# Altium PCB Power_Board.PcbDoc (part 1 of 2)
Units mm, origin at the board's own origin, x right, y up, seen from the top; angles counter-clockwise.
Board outline 220 x 160 mm, 2 copper layers (Top Layer, Bottom Layer), stack 1.58 mm thick; 209 components, 107 nets, 531 pads, 153 vias.
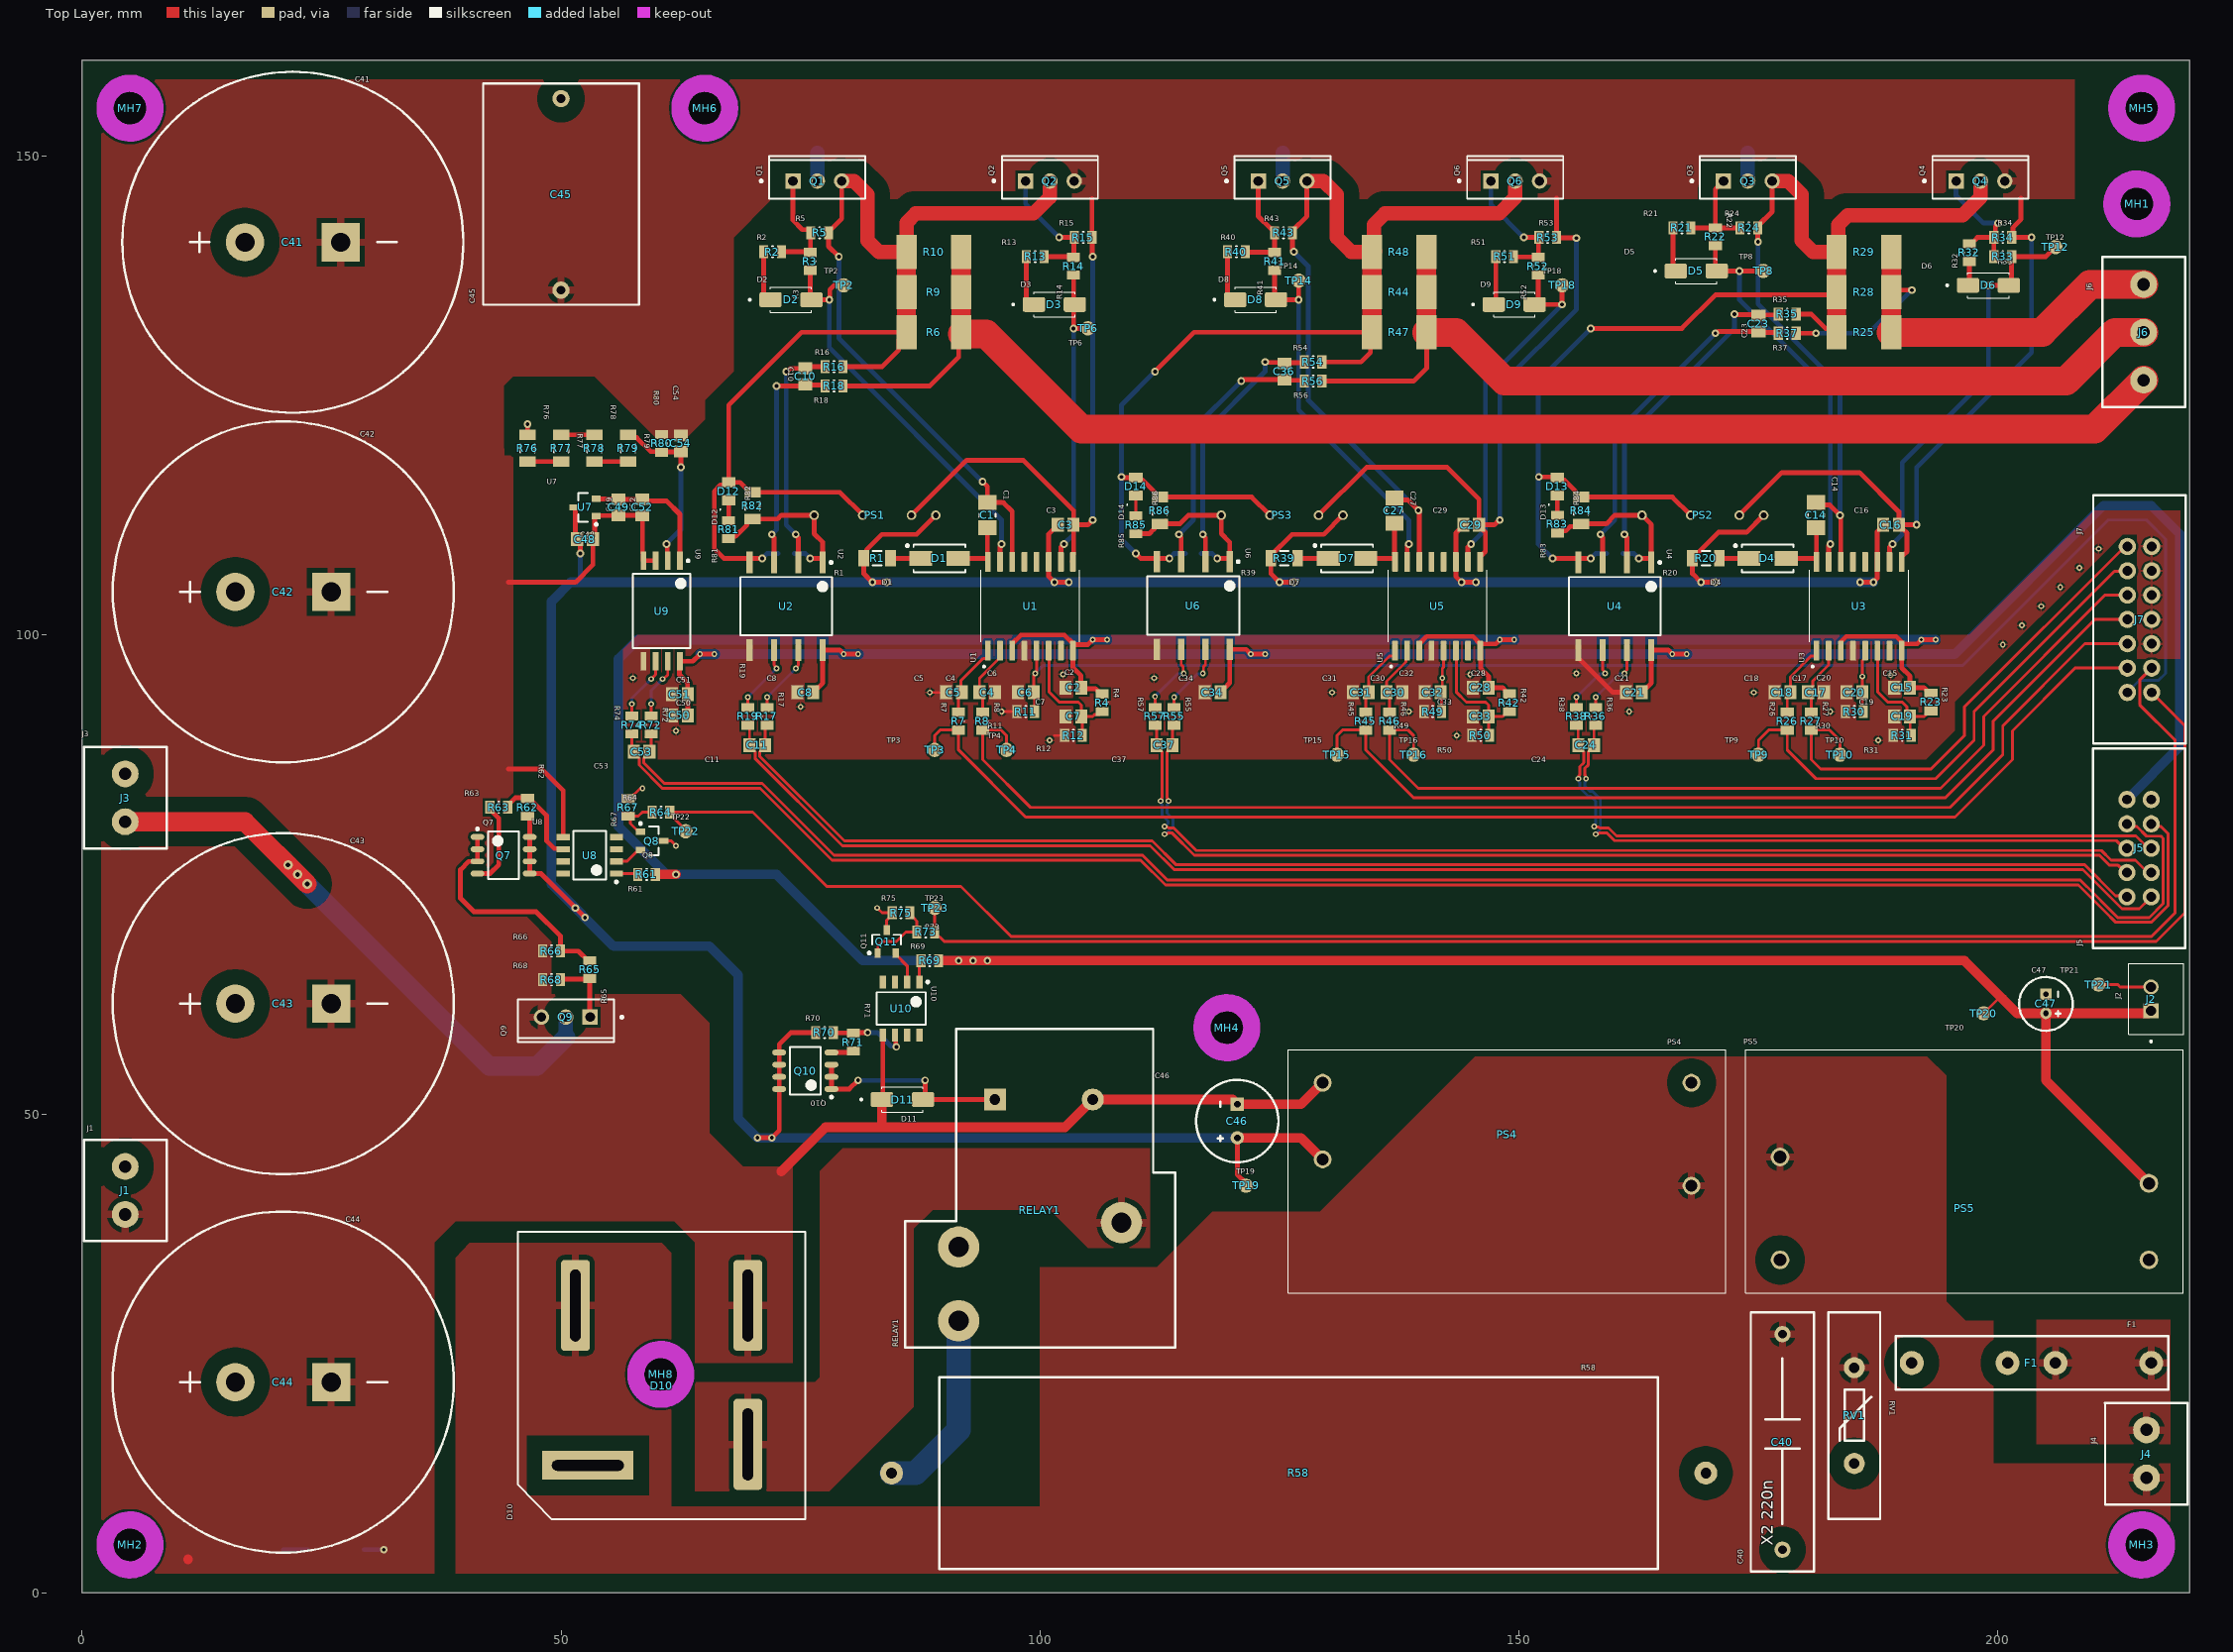
[diagram p0: Top Layer view]
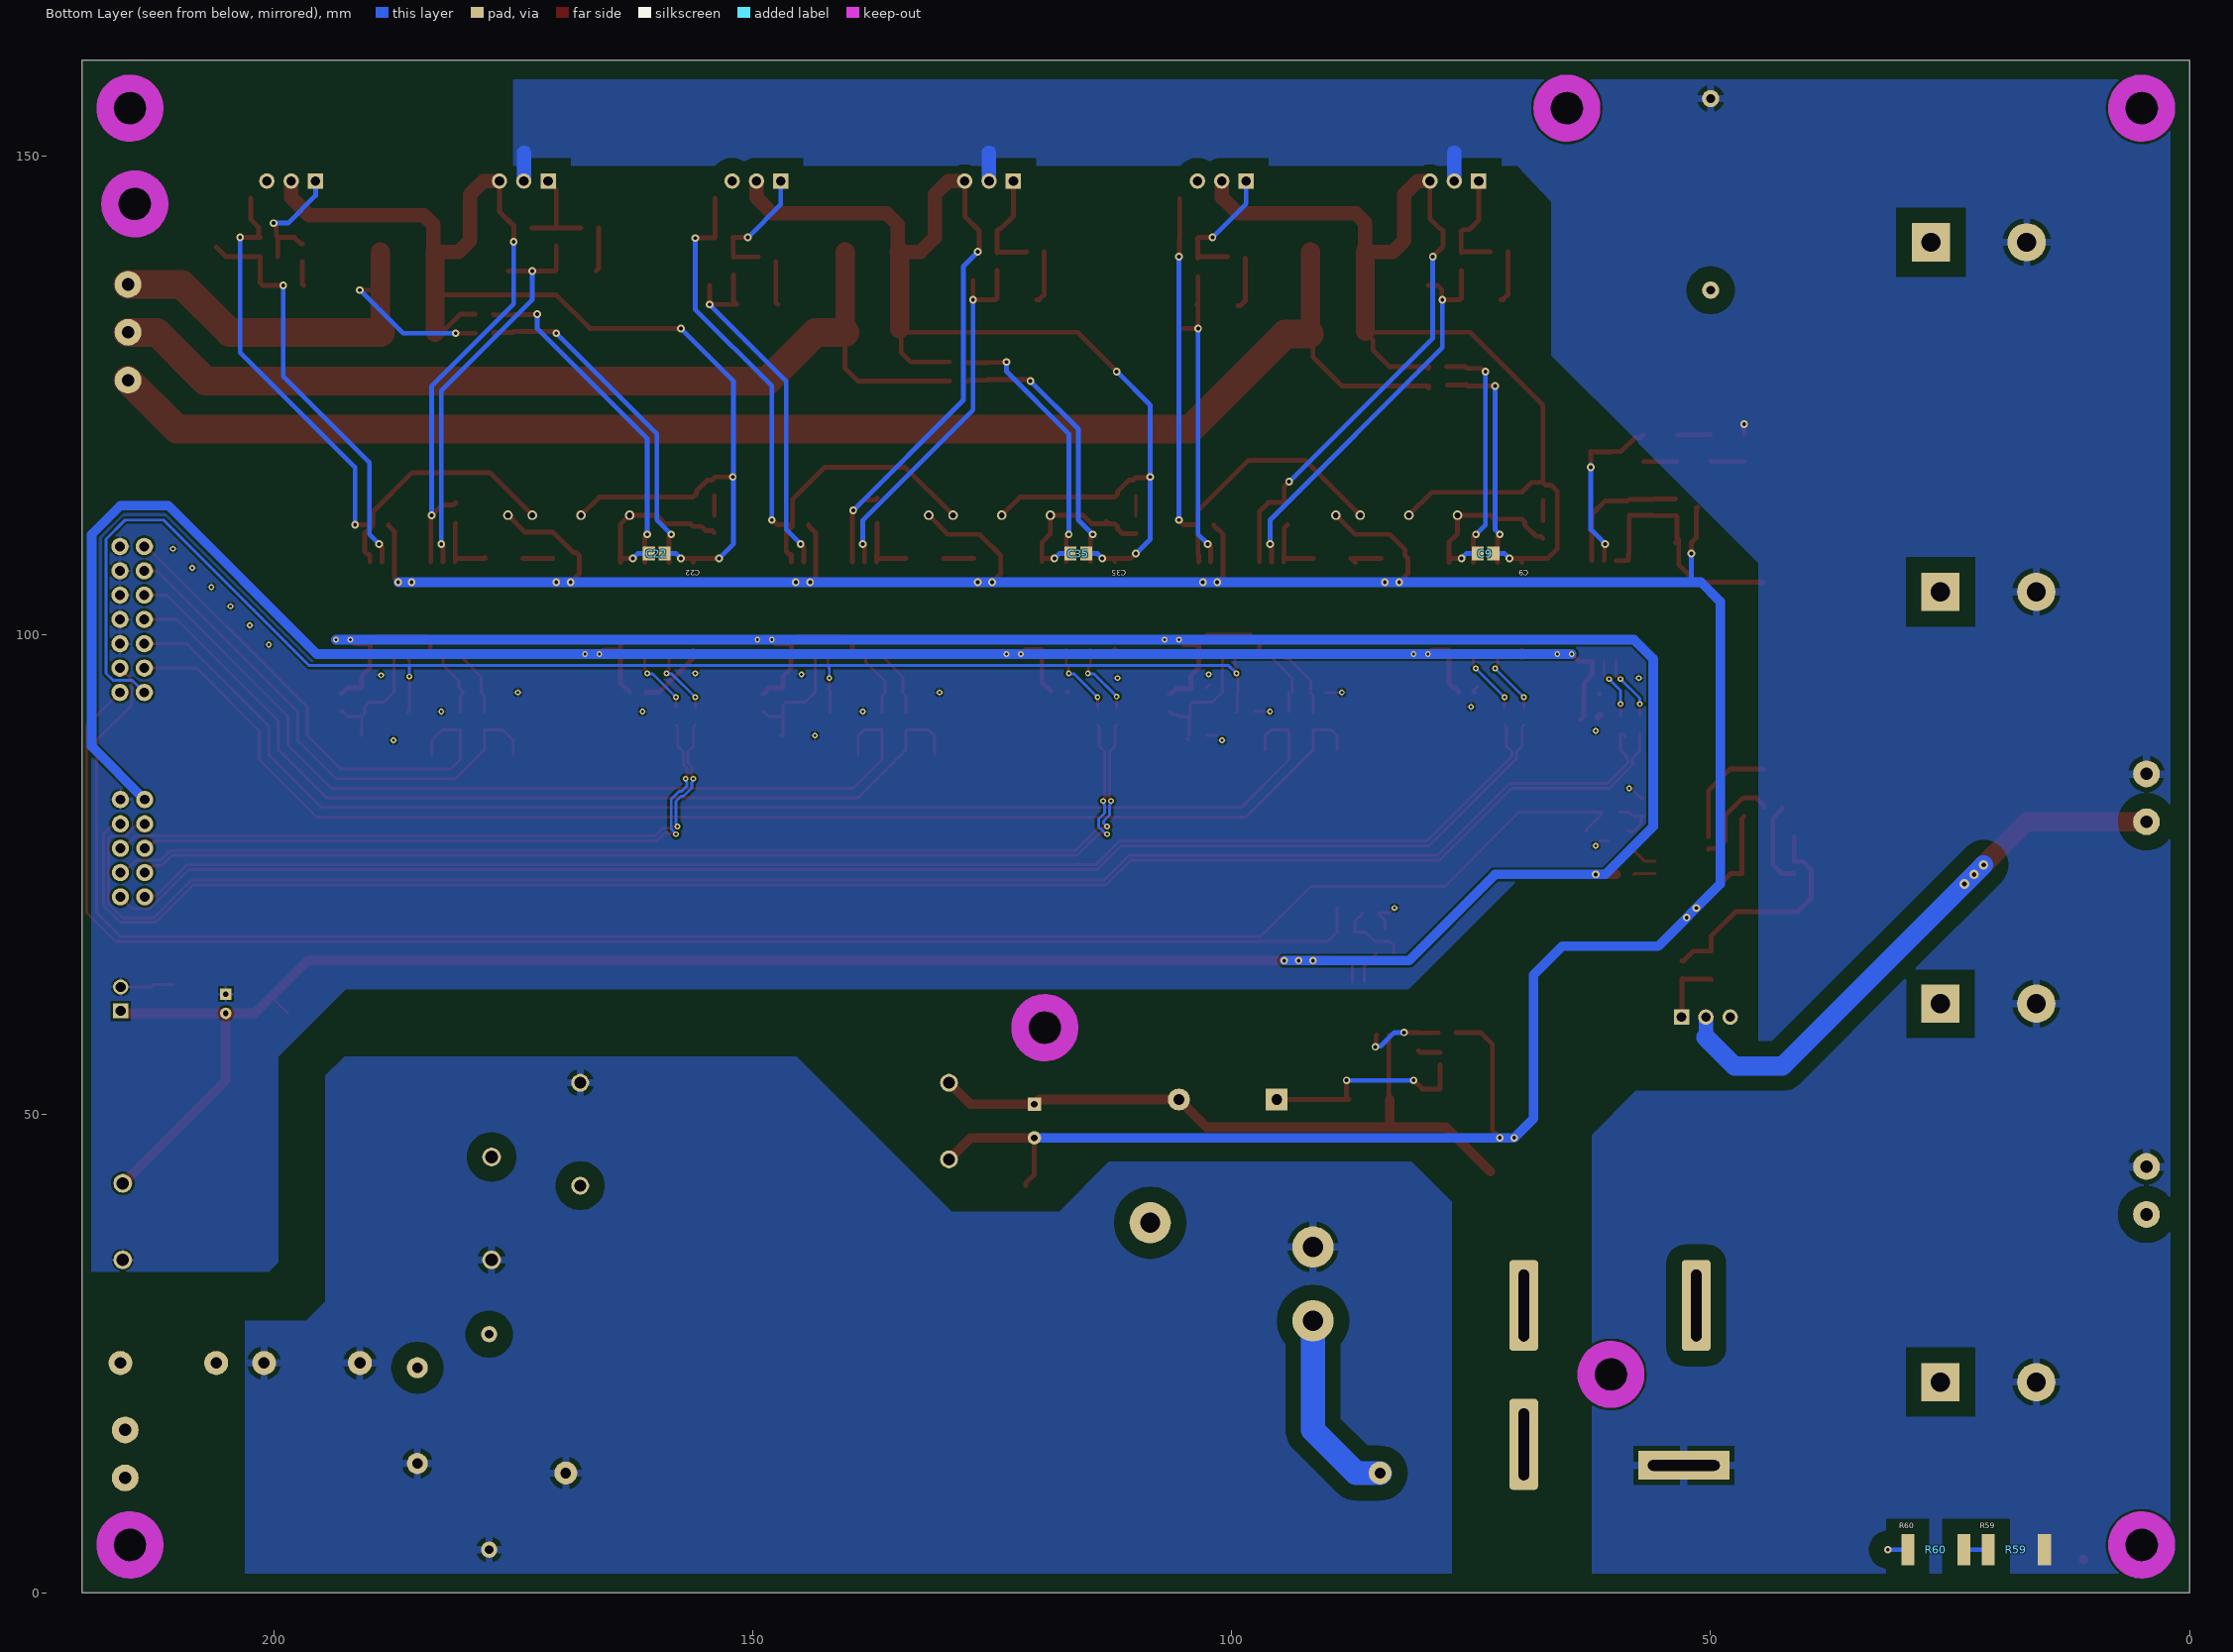
[diagram p1: Bottom Layer view, seen from below]
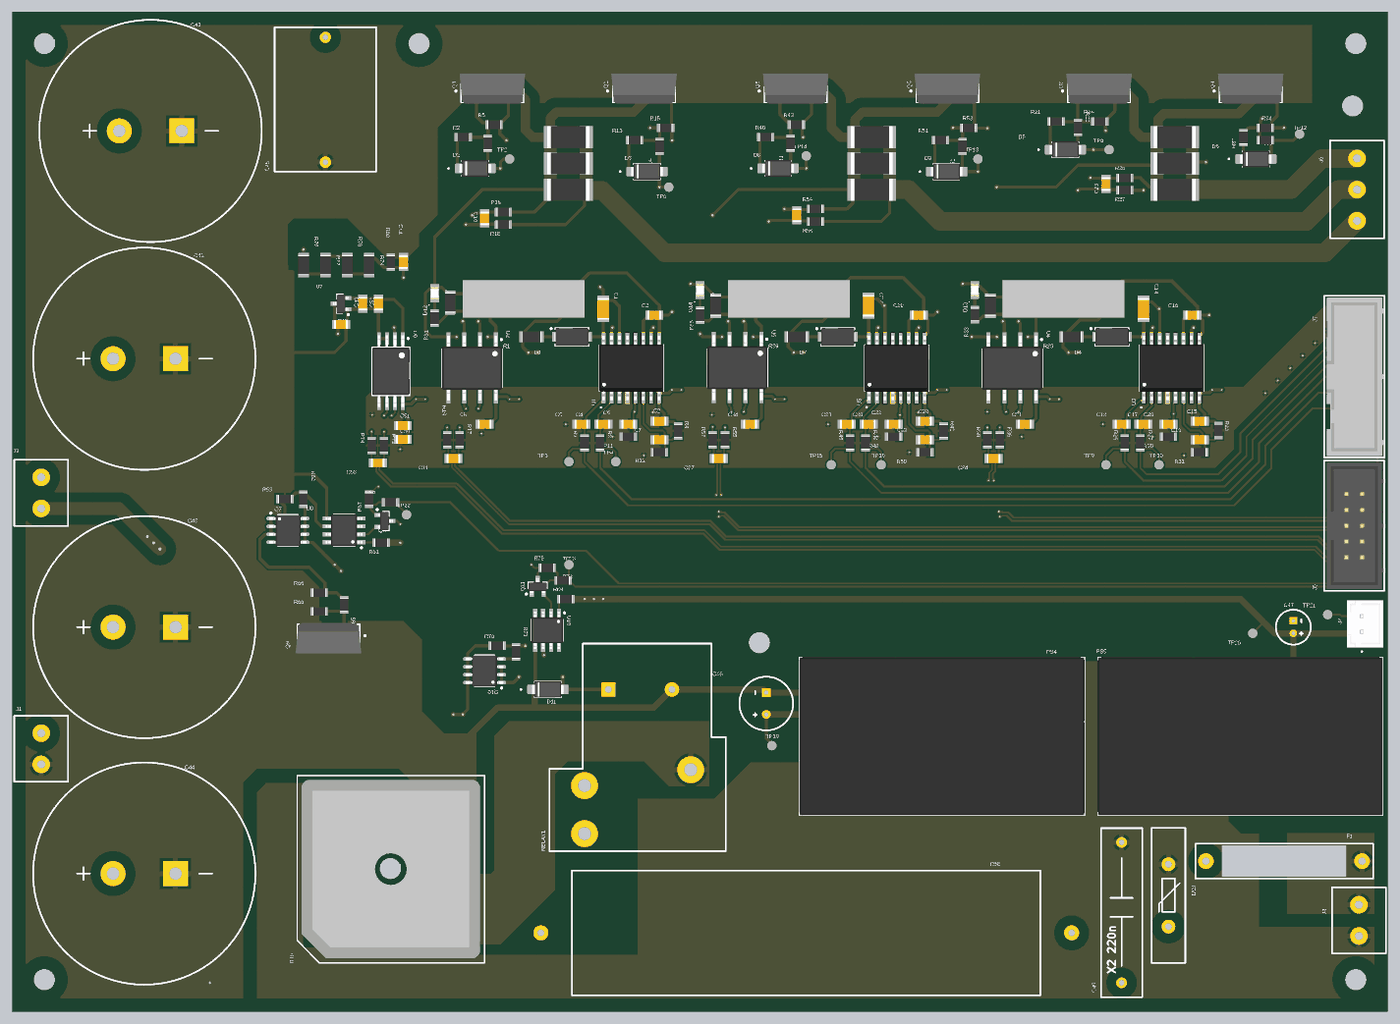
[diagram p3: 3D render of the assembled board from above, using the file's embedded part models]
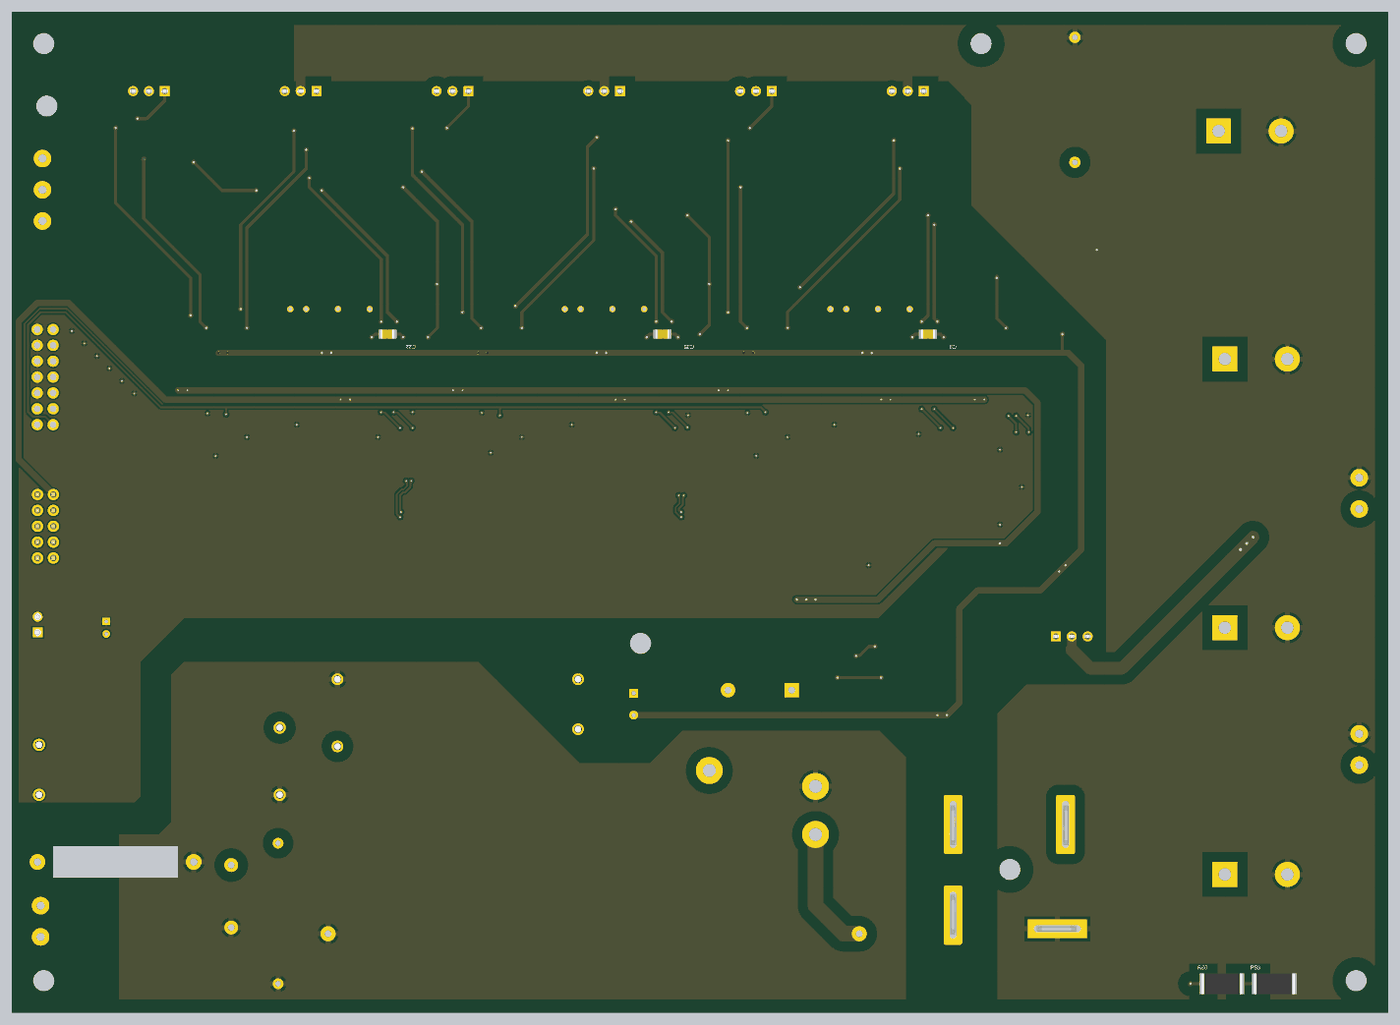
[diagram p4: 3D render of the assembled board from below, using the file's embedded part models]

## Layer stack, top to bottom
Top Solder: solder mask 0.0102, Solder Resist, Dk 3.5
Top Layer: signal copper 0.07
Dielectric 1: dielectric 1.4397, FR-4, Dk 4.8
Bottom Layer: signal copper 0.07
Bottom Solder: solder mask 0.0102, Solder Resist, Dk 3.5

## Board outline
0,0 0,160 220,160 220,0

## Design rules (kind name [scope] priority, off if disabled: settings)
Clearance +VDC_midpoints [InPadClass('transistor_midpoints') vs InNet('+VDC')] p1: gap=0.95 ignorepadtopadclearanceinfootprint=TRUE
Clearance transistors [InPadClass('hot_transistors') vs IsTrack] p2: gap=0.95 ignorepadtopadclearanceinfootprint=TRUE
Clearance signals_hot [InNetClass('Signals_hot_low') OR InNetClass('-VDC') vs InNetClass('Signals_hot_high') OR InNetClass('Midpoints')] p3: gap=1.6 ignorepadtopadclearanceinfootprint=TRUE
Clearance signals_cold_2 [InNetClass('Signals_Cold') vs InNetClass('-VDC') OR InNetClass('High_Power') OR InNetClass('Midpoints') OR InNetClass('Signals_hot_high') OR InNetClass('Signals_hot_low')] p4: gap=4 ignorepadtopadclearanceinfootprint=TRUE
Clearance signals_cold_1 [InNetClass('Signals_Cold') vs InNetClass('Signals_Cold')] p5: gap=0.2 ignorepadtopadclearanceinfootprint=TRUE
Clearance signals_hot_high_1 [InNetClass('Signals_hot_high') vs InNetClass('Signals_hot_high') OR  InNetClass('Midpoints')] p6: gap=0.3 ignorepadtopadclearanceinfootprint=TRUE
Clearance signals_hot_low_1 [InNetClass('Signals_hot_low') vs InNetClass('-VDC') OR InNetClass('Signals_hot_low')] p7: gap=0.3 ignorepadtopadclearanceinfootprint=TRUE
Clearance high_power_1 [InNetClass('High_Power') vs InNetClass('-VDC') OR InNetClass('High_Power') OR InNetClass('Midpoints') OR InNetClass('Signals_hot_high') OR InNetClass('Signals_hot_low')] p8: gap=1.6 ignorepadtopadclearanceinfootprint=TRUE
Creepage [All] p1: checkdistance=0.254 applytopolygonpour=TRUE
DiffPairsRouting [All] p1: maxlimit=0.5 minlimit=0.2 mostfreqgap=0.2 toplayer_minwidth=0.3 toplayer_maxwidth=0.5 toplayer_prefwidth=0.3 bottomlayer_minwidth=0.3 bottomlayer_maxwidth=0.5 bottomlayer_prefwidth=0.3 maxuncoupledlength=12.7
Height [All] p1: minheight=0 maxheight=26 prefheight=12.7
HoleSize [All] p1: absolutevalues=TRUE maxlimit=8 minlimit=0.025 maxpercent=80.000 minpercent=20.000
PlaneClearance [All] p1: clearance=0.5
PlaneConnect [All] p1: planeconnectstyle=Relief reliefexpansion=0.5 reliefentries=4 reliefconductorwidth=0.3 reliefairgap=0.3
PolygonConnect high_power_polygon [InNetClass('High_Power') OR InNetClass('Midpoints') OR InNetClass('-VDC')] p1: thpad.connectstyle=Relief thpad.reliefconductorwidth=0.8 thpad.reliefentries=4 thpad.polygonreliefangle="90 Angle" thpad.airgapwidth=0.5 smdpad.connectstyle=Direct smdpad.reliefconductorwidth=0.8 smdpad.reliefentries=4 smdpad.polygonreliefangle="90 Angle" smdpad.airgapwidth=0.5 via.connectstyle=Direct via.reliefconductorwidth=0.8 via.reliefentries=4 via.polygonreliefangle="90 Angle" via.airgapwidth=0.5
PolygonConnect signals_hot_polygon [InNetClass('Signals_hot_high') OR InNetClass('Signals_hot_low')] p2: connectstyle=Relief reliefconductorwidth=0.3 reliefentries=4 polygonreliefangle="90 Angle" airgapwidth=0.3
PolygonConnect signals_cold_polygon [InNetClass('Signals_Cold')] p3: thpad.connectstyle=Relief thpad.reliefconductorwidth=0.3 thpad.reliefentries=4 thpad.polygonreliefangle="90 Angle" thpad.airgapwidth=0.2 smdpad.connectstyle=Direct smdpad.reliefconductorwidth=0.2 smdpad.reliefentries=4 smdpad.polygonreliefangle="90 Angle" smdpad.airgapwidth=0.2 via.connectstyle=Relief via.reliefconductorwidth=0.2 via.reliefentries=4 via.polygonreliefangle="90 Angle" via.airgapwidth=0.2
RoutingCorners [All] p1: cornerstyle=45-Degree minsetback=3 maxsetback=3
RoutingVias high_power_via [InNetClass('High_Power') OR InNetClass('Midpoints') OR InNetClass('-VDC')] p1: holewidth=0.5 width=1 viastyle="Through Hole" minholewidth=0.4 minwidth=0.8 maxholewidth=0.6 maxwidth=1.2
RoutingVias signals_hot_via [InNetClass('Signals_hot_high') OR InNetClass('Signals_hot_low')] p2: holewidth=0.4 width=0.8 viastyle="Through Hole" minholewidth=0.3 minwidth=0.6 maxholewidth=0.5 maxwidth=1
RoutingVias signals_cold_via [InNetClass('Signals_Cold')] p3: holewidth=0.3 width=0.6 viastyle="Through Hole" minholewidth=0.2 minwidth=0.4 maxholewidth=0.4 maxwidth=0.8
SolderMaskExpansion SolderMask_Via [IsVia] p1: expansion=0.102 istentingtop=TRUE
SolderMaskExpansion SolderMask_Pad [IsPad] p2: expansion=0.05 istentingtop=FALSE
UnRoutedNet [All] p1: checkbadconnections=TRUE
Width signals_cold_width [InNetClass('Signals_Cold')] p1: maxlimit=1 minlimit=0.2 preferedwidth=0.3 minimp=50.000000 maximp=50.000000 favimp=50.000000
Width high_power_width [InNetClass('High_Power') OR InNetClass('Midpoints') OR InNetClass('-VDC')] p2: maxlimit=5 minlimit=0.5 preferedwidth=2 minimp=50.000000 maximp=50.000000 favimp=50.000000
Width signals_hot_width [InNetClass('Signals_hot_high') OR InNetClass('Signals_hot_low')] p3: maxlimit=2 minlimit=0.3 preferedwidth=0.5 minimp=50.000000 maximp=50.000000 favimp=50.000000
23 further rules are at their usual default settings.

## Classes and differential pairs
component class Designator: C48 C49 C50 C51 C52 C53 C54 D11 Q7 Q8 Q9 Q10 Q11 R61 R62 R63 R64 R65 R66 R67 R68 R69 R70 R71 R72 R73 R74 R75 R76 R77 R78 R79 R80 TP22 TP23 U7 U8 U9 U10
pad class transistor_midpoints: Q1-3 Q3-3 Q5-3
net class -VDC: -VDC
net class Midpoints: MIDPOINT_2 MIDPOINT_3 MIDPOINT_4 OUT_1_N OUT_AUX_1 OUT_MAIN_1
net class Signals_hot_high: 5V_HOT_2 5V_HOT_3 5V_HOT_4 +12V_BOOT_2 +12V_BOOT_3 +12V_BOOT_4 NetC10_1 NetC10_2 NetC23_1 NetC23_2 NetC36_1 NetC36_2 NetD2_1 NetD5_1 NetD8_1 NetD12_1 NetD13_1 NetD14_1 NetQ1_1 NetQ3_1 NetQ5_1 OUTA_2 OUTA_3 OUTA_4
net class Signals_hot_low: +5V_HOT_6 +12V +COIL_1 NetD1_1 NetD3_1 NetD4_1 NetD6_1 NetD7_1 NetD9_1 NetQ2_1 NetQ4_1 NetQ6_1 NetQ7_1 NetQ7_3 NetQ9_1 NetQ10_1 NetR62_1 NetR70_1 NetR76_1 NetR77_2 NetR78_1 OUTB_2 OUTB_3 OUTB_4 V_MEAS_6
pad class hot_transistors: Q1-1 Q1-2 Q1-3 Q2-1 Q2-2 Q2-3 Q3-1 Q3-2 Q3-3 Q4-1 Q4-2 Q4-3 Q5-1 Q5-2 Q5-3 Q6-1 Q6-2 Q6-3 Q9-1 Q9-2 Q9-3
net class Signals_Cold: +3V3A +5V +ISENSE_1_N +ISENSE_AUX_1 +ISENSE_MAIN_1 +VSENSE_1 -ISENSE_1_N -ISENSE_AUX_1 -ISENSE_MAIN_1 -VSENSE_1 BRAKE_1 DISABLE_1 GND INA_1_N INA_AUX_1 INA_MAIN_1 INB_1_N INB_AUX_1 INB_MAIN_1 NetC4_2 NetC5_2 NetC7_2 NetC17_2 NetC18_2 NetC19_2 NetC30_2 NetC31_2 NetC33_2 NetQ8_1 NetQ8_2 NetQ11_1 NetQ11_2 NetR17_1 NetR19_1 NetR36_1 NetR38_1 NetR55_1 NetR57_1 NetR61_1 NetR69_1 OUTN_6 OUTP_6 PRECHARGE_1
net class High_Power: +VDC AC_L_FUSED_5 AC_N NetD10_2 NetF1_1 NetJ3_2 NetR58_2 NetR59_1
differential pair VSENSE: ++VSENSE_1 --VSENSE_1
differential pair ISENSE_MAIN: ++ISENSE_MAIN_1 --ISENSE_MAIN_1
differential pair ISENSE_AUX: ++ISENSE_AUX_1 --ISENSE_AUX_1
differential pair ISENSE_N: ++ISENSE_1_N --ISENSE_1_N

## Components (designator, comment, footprint, x,y, rotation, side; value= is the part's Value field where it differs from the comment)
C1 "10u" CAPACITOR_1206 94.5,112.5 r90 top
C2 "1u" Capacitor_0805 103.5,94.5 r180 top
C3 "1u" Capacitor_0805 102.675,111.5 r180 top
C4 "22p" Capacitor_0805 94.5,94 r180 top
C5 "22p" Capacitor_0805 91,94 r0 top
C6 "1n" Capacitor_0805 98.5,94 r0 top
C7 "100p" Capacitor_0805 103.5,91.5 r0 top
C8 "100n" Capacitor_0805 75.5,94 r0 top
C9 "1u" Capacitor_0805 73.5,108.5 r0 bottom
C10 "330p" Capacitor_0805 75.5,127 r90 top
C11 "150n" Capacitor_0805 70.5,88.5 r0 top
C14 "1u" CAPACITOR_1206 181,112.5 r90 top
C15 "1u" Capacitor_0805 190,94.5 r180 top
C16 "1u" Capacitor_0805 188.825,111.5 r180 top
C17 "22p" Capacitor_0805 181,94 r180 top
C18 "22p" Capacitor_0805 177.5,94 r0 top
C19 "100p" Capacitor_0805 190,91.5 r0 top
C20 "1n" Capacitor_0805 185,94 r0 top
C21 "100n" Capacitor_0805 162,94 r0 top
C22 "1u" Capacitor_0805 160,108.5 r0 bottom
C23 "330p" Capacitor_0805 175,132.5 r90 top
C24 "150n" Capacitor_0805 157,88.5 r0 top
C27 "10u" CAPACITOR_1206 137,113 r90 top
C28 "1u" Capacitor_0805 146,94.5 r180 top
C29 "1u" Capacitor_0805 145,111.5 r180 top
C30 "22p" Capacitor_0805 137,94 r180 top
C31 "22p" Capacitor_0805 133.5,94 r0 top
C32 "1n" Capacitor_0805 141,94 r0 top
C33 "100p" Capacitor_0805 146,91.5 r0 top
C34 "100n" Capacitor_0805 118,94 r0 top
C35 "1u" Capacitor_0805 116,108.5 r0 bottom
C36 "330p" Capacitor_0805 125.5,127.5 r90 top
C37 "150n" Capacitor_0805 113,88.5 r0 top
C40 "X2 220n" R46KN322000M1K 177.5,27 r0 top
C41 "470u" HF2G477M35040HC 27,141 r180 top
C42 "470u" HF2G477M35040HC 26,104.5 r180 top
C43 "470u" HF2G477M35040HC 26,61.5 r180 top
C44 "470u" HF2G477M35040HC 26,22 r180 top
C45 "1u" MPP-1UR20/630 50,136 r90 top
C46 "220u" EEUFR1V221 120.6,51 r270 top
C47 "47u" RD1C476M05011BB 205,62.5 r270 top
C48 "1u" Capacitor_0805 52.5,110 r180 top
C49 "10u" Capacitor_0805 56,113.325 r90 top
C50 "1u" Capacitor_0805 62.4,91.6 r0 top
C51 "100n" Capacitor_0805 62.4,93.8 r0 top
C52 "100n" Capacitor_0805 58.5,113.325 r90 top
C53 "150n" Capacitor_0805 58.4,87.8 r0 top
C54 "100p" Capacitor_0805 62.5,120 r270 top
D1 "STTH1R06A" STTH1R06A 89.5,108 r0 top
D2 "SS14" DIOM5226X230N 74,135 r0 top
D3 "SS14" DIOM5226X230N 101.5,134.5 r0 top
D4 "STTH1R06A" STTH1R06A 175.95,108 r0 top
D5 "SS14" DIOM5226X230N 168.5,138 r0 top
D6 "SS14" DIOM5226X230N 199,136.5 r0 top
D7 "STTH1R06A" STTH1R06A 132.05,108 r0 top
D8 "SS14" DIOM5226X230N 122.5,135 r0 top
D9 "SS14" DIOM5226X230N 149.5,134.5 r0 top
D10 "Bridge_1ph" KBPCxxxxFP 51.5,13.3 r90 top
D11 "SS14" DIOM5226X230N 85.635,51.5 r0 top
D12 "LTST-C171KRKT" LTST-C171K 67.5,115 r90 top
D13 "LTST-C171KRKT" LTST-C171K 154,115.5 r90 top
D14 "LTST-C171KRKT" LTST-C171K 110,115.5 r90 top
F1 "Fuse clips" 0751.0056 216,24 r180 top
J1 "MKDSN1.5/2" 1729018 4.5,44.5 r0 top
J2 "JST_B2B-XH-A_(LF)(SN)" JST_B2B-XH-A_(LF)(SN) 216.5,62 r270 top
J3 "MKDSN1.5/2" 1729018 4.5,85.5 r0 top
J4 "MKDSN1.5/2" 1729018 215.5,17 r0 top
J5 "DS1013-10SSIB1-B-0" DS1013-10SSIB1-B-0 213.46,72.66 r90 top
J6 "MKDSN 1,5/ 3-5,08" 1729131 215.2,126.6 r180 top
J7 "DS1013-14SSIBG" DS1013-14SSIBG 216.04,109.24 r270 top
MH1 "Mounting Hole" "M3 MOUNTING HOLE" 214.5,145 r0 top
MH2 "Mounting Hole" "M3 MOUNTING HOLE" 5,5 r0 top
MH3 "Mounting Hole" "M3 MOUNTING HOLE" 215,5 r0 top
MH4 "Mounting Hole" "M3 MOUNTING HOLE" 119.5,59 r0 top
MH5 "Mounting Hole" "M3 MOUNTING HOLE" 215,155 r0 top
MH6 "Mounting Hole" "M3 MOUNTING HOLE" 65,155 r0 top
MH7 "Mounting Hole" "M3 MOUNTING HOLE" 5,155 r0 top
MH8 "Mounting Hole" "M3 mounting hole" 60.4,22.8 r0 top
PS1 "TBA 1-1211E" "TBA 1-1211E" 76.42,112.5 r0 top
PS2 "TBA 1-1211E" "TBA 1-1211E" 162.84,112.5 r0 top
PS3 "TBA 1-1211E" "TBA 1-1211E" 118.92,112.5 r0 top
PS4 "IRM-10-12" CONV_IRM-10-12 148.75,44 r180 top
PS5 "IRM-10-5" CONV_IRM-10-5 196.5,44 r0 top
Q1 "WMK36N65C4" TO220-3 76.75,147.4 r90 top
Q2 "WMK36N65C4" TO220-3 101.03,147.4 r90 top
Q3 "WMK36N65C4" TO220-3 173.89,147.4 r90 top
Q4 "WMK36N65C4" TO220-3 198.17,147.4 r90 top
Q5 "WMK36N65C4" TO220-3 125.32,147.4 r90 top
Q6 "WMK36N65C4" TO220-3 149.6,147.4 r90 top
Q7 "AO4485" AO4485 44,77 r0 top
Q8 "BSS806NH6327XTSA1" BSS806NH6327XTSA1 59.5,78.5 r0 top
Q9 "WMK36N65C4" TO220-3 50.5,60.1 r270 top
Q10 "AO4485" AO4485 75.5,54.5 r180 top
Q11 "BSS806NH6327XTSA1" BSS806NH6327XTSA1 84,68 r90 top
R1 "4R7" RESISTOR_1206 83,108 r0 top
R2 "10R" RESISTOR_0805 72.075,140 r0 top
R3 "10R" RESISTOR_0805 76,139 r90 top
R4 "0R" RESISTOR_0805 106.5,92.925 r90 top
R5 "100k" RESISTOR_0805 77,142 r180 top
R6 "30mR" MAR251203FR030S 88.905,131.6 r0 top
R7 "100R" RESISTOR_0805 91.5,91 r90 top
R8 "100R" RESISTOR_0805 94,91 r90 top
R9 "30mR" MAR251203FR030S 88.905,135.8 r0 top
R10 "30mR" MAR251203FR030S 88.905,140 r0 top
R11 "100k" RESISTOR_0805 98.5,92 r0 top value=100R
R12 "2k2" RESISTOR_0805 103.5,89.5 r0 top value=100R
R13 "10R" RESISTOR_0805 99.5,139.5 r0 top
R14 "10R" RESISTOR_0805 103.5,138.5 r90 top
R15 "100k" RESISTOR_0805 104.5,141.5 r180 top
R16 "22R" RESISTOR_0805 78.5,128 r180 top
R17 "100R" RESISTOR_0805 71.5,91.5 r270 top
R18 "22R" RESISTOR_0805 78.5,126 r180 top
R19 "100R" RESISTOR_0805 69.5,91.5 r270 top
R20 "4R7" RESISTOR_1206 169.5,108 r0 top
R21 "10R" RESISTOR_0805 167,142.5 r0 top
R22 "10R" RESISTOR_0805 170.5,141.575 r90 top
R23 "0R" RESISTOR_0805 193,93 r90 top
R24 "100k" RESISTOR_0805 174,142.5 r180 top
R25 "30mR" MAR251203FR030S 186,131.6 r0 top
R26 "100R" RESISTOR_0805 178,91 r90 top
R27 "100R" RESISTOR_0805 180.5,91 r90 top
R28 "30mR" MAR251203FR030S 186,135.8 r0 top
R29 "30mR" MAR251203FR030S 186,140 r0 top
R30 "100k" RESISTOR_0805 185,92 r0 top value=100R
R31 "2k2" RESISTOR_0805 190,89.5 r0 top value=100R
R32 "10R" RESISTOR_0805 197,139.925 r90 top
R33 "10R" RESISTOR_0805 200.5,139.5 r180 top
R34 "100k" RESISTOR_0805 200.5,141.5 r180 top
R35 "22R" RESISTOR_0805 178,133.5 r180 top
R36 "100R" RESISTOR_0805 158,91.5 r270 top
R37 "22R" RESISTOR_0805 178,131.5 r180 top
R38 "100R" RESISTOR_0805 156,91.5 r270 top
R39 "4R7" RESISTOR_1206 125.5,108 r0 top
R40 "10R" RESISTOR_0805 120.5,140 r0 top
R41 "10R" RESISTOR_0805 124.5,139 r90 top
R42 "0R" RESISTOR_0805 149,92.925 r90 top
R43 "100k" RESISTOR_0805 125.425,142 r180 top
R44 "30mR" MAR251203FR030S 137.5,135.8 r0 top
R45 "100R" RESISTOR_0805 134,91 r90 top
R46 "100R" RESISTOR_0805 136.5,91 r90 top
R47 "30mR" MAR251203FR030S 137.5,131.6 r0 top
R48 "30mR" MAR251203FR030S 137.5,140 r0 top
R49 "100k" RESISTOR_0805 141,92 r0 top value=100R
R50 "2k2" RESISTOR_0805 146,89.5 r0 top value=100R
R51 "10R" RESISTOR_0805 148.5,139.5 r0 top
R52 "10R" RESISTOR_0805 152,138.5 r90 top
R53 "100k" RESISTOR_0805 153,141.5 r180 top
R54 "22R" RESISTOR_0805 128.5,128.5 r180 top
R55 "100R" RESISTOR_0805 114,91.5 r270 top
R56 "22R" RESISTOR_0805 128.5,126.5 r180 top
R57 "100R" RESISTOR_0805 112,91.5 r270 top
R58 "220R" CRL30W-220R 169.5,12.5 r180 top
R59 "100k" RESISTOR_2512 18.075,4.5 r180 bottom
R60 "100k" RESISTOR_2512 26.5,4.5 r180 bottom
R61 "390R" RESISTOR_0805 58.925,75 r0 top
R62 "4k7" RESISTOR_0805 46.5,82 r270 top
R63 "2k2" RESISTOR_0805 43.5,82 r0 top
R64 "1k" RESISTOR_0805 60.425,81.5 r180 top
R65 "100R" RESISTOR_0805 53,65.075 r90 top
R66 "2k2" RESISTOR_0805 49,67 r180 top
R67 "47k" RESISTOR_0805 57,82 r270 top
R68 "47k" RESISTOR_0805 49,64 r180 top
R69 "390R" RESISTOR_0805 88.5,66 r0 top
R70 "47k" RESISTOR_0805 77.5,58.5 r180 top
R71 "2k2" RESISTOR_0805 80.5,57.5 r90 top
R72 "100R" RESISTOR_0805 59.4,90.6 r270 top
R73 "1k" RESISTOR_0805 88.075,69 r180 top
R74 "100R" RESISTOR_0805 57.4,90.6 r270 top
R75 "47k" RESISTOR_0805 85.5,71 r0 top
R76 "499k" RESISTOR_1206 46.5,119.5 r90 top
R77 "499k" RESISTOR_1206 50,119.5 r90 top
R78 "499k" RESISTOR_1206 53.5,119.5 r90 top
R79 "499k" RESISTOR_1206 57,119.5 r90 top
R80 "6k2" RESISTOR_0805 60.5,120 r270 top
R81 "1k2" RESISTOR_0805 67.5,111 r90 top
R82 "330R" RESISTOR_1206 70,113.5 r90 top
R83 "1k2" RESISTOR_0805 154,111.575 r90 top
R84 "330R" RESISTOR_1206 156.5,113 r90 top
R85 "1k2" RESISTOR_0805 110,111.5 r90 top
R86 "330R" RESISTOR_1206 112.5,113 r90 top
RELAY1 "R40N3011851012" R40N3011851012 95.3,51.5 r90 top
RV1 "B72220S0271K101" B72220S0271K101 185,23.5 r270 top
TP2 "TestPoint" TestPoint_1.5mm 79.5,136.5 r90 top
TP3 "TestPoint" TestPoint_1.5mm 89,88 r90 top
TP4 "TestPoint" TestPoint_1.5mm 96.5,88 r90 top
TP6 "TestPoint" TestPoint_1.5mm 105,132 r90 top
TP8 "TestPoint" TestPoint_1.5mm 175.5,138 r90 top
TP9 "TestPoint" TestPoint_1.5mm 175,87.5 r90 top
TP10 "TestPoint" TestPoint_1.5mm 183.5,87.5 r90 top
TP12 "TestPoint" TestPoint_1.5mm 206,140.5 r90 top
TP14 "TestPoint" TestPoint_1.5mm 127,137 r90 top
TP15 "TestPoint" TestPoint_1.5mm 131,87.5 r90 top
TP16 "TestPoint" TestPoint_1.5mm 139,87.5 r90 top
TP18 "TestPoint" TestPoint_1.5mm 154.5,136.5 r90 top
TP19 "TestPoint" TestPoint_1.5mm 121.5,42.5 r180 top
TP20 "TestPoint" TestPoint_1.5mm 198.5,60.5 r90 top
TP21 "TestPoint" TestPoint_1.5mm 210.5,63.5 r90 top
TP22 "TestPoint" TestPoint_1.5mm 63,79.5 r90 top
TP23 "TestPoint" TestPoint_1.5mm 89,71.5 r90 top
U1 "UCC21520ADW" UCC21520ADW 99,103 r90 top
U2 "AMC1200STDUBRQ1" SOP254P1040X485-8N 73.5,103 r270 top
U3 "UCC21520ADW" UCC21520ADW 185.5,103 r90 top
U4 "AMC1200STDUBRQ1" SOP254P1040X485-8N 160,103 r270 top
U5 "UCC21520ADW" UCC21520ADW 141.5,103 r90 top
U6 "AMC1200STDUBRQ1" SOP254P1040X485-8N 116,103.075 r270 top
U7 "AP7387-50SA-7" SOT90P240X110-3N 52.5,113.325 r180 top
U8 "MOC207M" SOIC127P590X363-8N 53,77 r180 top
U9 "AMC1211AQDWVQ1" SOIC127P1150X275-8N 60.5,102.5 r270 top
U10 "MOC207M" SOIC127P590X363-8N 85.5,61 r270 top

## Footprints (in the part's own frame and the unit in brackets; to place one, negate y for a bottom-side part, rotate by r counter-clockwise, add the part's x,y. Pads: shape width x height; smd on the part's side, far side on the other; paste and mask are expansions set on the pad)
0751.0056 [mm] "Fuse clips; cylindrical fuses; THT; 5x20mm,6.3x32mm; 16A; bronze"
  round 2.5 hole 1.2: 1(0,0) 2(10,0) 3(15,0) 4(25,0)
  silkscreen extent -1.78,-2.79 26.67,2.79
1729018 [mm] "Connector: PCB terminal block; 17.5A; 400V; PIN: 2; screw terminal"
  round 2.8 hole 1.3: 1(0,0) 2(0,-5)
  silkscreen extent -4.32,-7.78 4.32,2.79
1729131 [mm] "Connector: PCB terminal block; 17.5A; 400V; PIN: 3; screw terminal"
  round 2.8 hole 1.3: 1(0,0) 2(0,-5) 3(0,-10)
  silkscreen extent -4.32,-12.85 4.32,2.79
AO4485 [mm] "Transistor: P-MOSFET; unipolar; -40V; -8A; 1.1W; SO8"
  oval 1.45x0.6 smd: 1(-2.725,1.905) 2(-2.725,0.635) 3(-2.725,-0.635) 4(-2.725,-1.905) 5(2.725,-1.905) 6(2.725,-0.635) 7(2.725,0.635) 8(2.725,1.905)
  silkscreen extent -2.85,-2.5 1.6,2.88, body extent -3,-2.5 3,2.5, height 1.75
B72220S0271K101 [mm]
  round 2.2 hole 1.1: 1(0,0) 2(10,0)
  silkscreen extent -5.8,-2.7 15.8,2.7
BSS806NH6327XTSA1 [mm] "Transistor: N-MOSFET; unipolar; 20V; 2.3A; 0.5W; SOT23"
  rect 1x0.65 smd: 1(-1.2,0.95) 2(-1.2,-0.95) 3(1.2,0)
  silkscreen extent -1.32,-1.5 0.7,1.95, body extent -1.3,-1.5 1.3,1.5, height 1.1
Capacitor_0805 [mm] "MLCC capacitor in 0805 package"
  rect 1.25x1.45 smd: 1(-0.825,0) 2(0.825,0)
  body extent -1.1,-0.72 1.1,0.72, height 1.35
CAPACITOR_1206 [mm] "MLCC capacitor in 1206 package"
  rect 1.55x1.9 smd: 1(-1.325,0) 2(1.325,0)
  silkscreen extent -0.15,-0.85 0.15,0.85, body extent -1.75,-0.95 1.75,0.95, height 1.9
CONV_IRM-10-5 [mm]
  round 1.95 hole 1.3: 1(-19.25,1.5) 2(-19.25,-9.25) 3(19.25,-9.25) 4(19.25,-1.25)
  silkscreen extent -22.85,-12.7 22.85,12.7, body extent -22.85,-12.7 22.85,12.7, height 21.5
CONV_IRM-10-12 [mm]
  round 1.86 hole 1.24: +V(19.25,-1.25) -V(19.25,-9.25) AC_L(-19.25,-9.25) AC_N(-19.25,1.5)
  silkscreen extent -22.85,-12.7 22.85,12.7, body extent -22.85,-12.7 22.85,12.7, height 21.5
CRL30W-220R [mm] "30W 220? cement resistor"
  round 2.4 hole 1.1: 1(0,0) 2(85,0)
  silkscreen extent 5,-10 80,10
DIOM5226X230N [mm]
  rrect25% 2.33x1.55 smd: 1(-2.135,0) 2(2.135,0)
  silkscreen extent -4.4,-1.3 2.15,1.3, body extent -2.6,-1.3 2.6,1.3, height 2.4
DS1013-10SSIB1-B-0 [mm] "Connector: IDC; socket; male; PIN: 10; straight; THT; 2.54mm; 2x5"
  round 1.8 hole 1.02: 1(0,0) 2(0,-2.54) 3(2.54,0) 4(2.54,-2.54) 5(5.08,0) 6(5.08,-2.54) 7(7.62,0) 8(7.62,-2.54) 9(10.16,0) 10(10.16,-2.54)
  silkscreen extent -5.33,-6.1 15.49,3.56, body extent -5.07,-5.99 15.23,3.11, height 9.1
DS1013-14SSIBG [mm] "Connector: IDC; socket; male; data; PIN: 14; straight; THT; 2.54mm"
  round 1.8 hole 1.02: 1(0,0) 2(0,-2.54) 3(2.54,0) 4(2.54,-2.54) 5(5.08,0) 6(5.08,-2.54) 7(7.62,0) 8(7.62,-2.54) 9(10.16,0) 10(10.16,-2.54) 11(12.7,0) 12(12.7,-2.54) 13(15.24,0) 14(15.24,-2.54)
  silkscreen extent -5.33,-6.1 20.57,3.56, body extent -5.08,-5.72 20.32,3.51, height 9.2
EEUFR1V221 [mm] "Capacitor: electrolytic; low ESR; THT; 220uF; 35VDC; O8x11.5mm"
  rect 1.4x1.4 hole 0.7: 1(0,0)
  round 1.4 hole 0.7: 2(3.5,0)
  silkscreen extent -2.55,-4.3 6.05,4.3
HF2G477M35040HC [mm] "Capacitor: electrolytic; SNAP-IN; 470uF; 400VDC; O35x40mm; ±20%"
  rect 4x4 hole 2: 1(0,0)
  round 4 hole 2: 2(10,0)
  silkscreen extent -12.8,-17.8 22.8,17.8
JST_B2B-XH-A_(LF)(SN) [mm] "Connector: wire-board; XH; socket; male; data; 3A; 250V; PIN: 2; 2.5mm"
  rect 1.575x1.575 hole 1.05: 1(1.25,-0.525)
  round 1.575 hole 1.05: 2(-1.25,-0.525)
  silkscreen extent -3.7,-2.88 4.54,2.88, body extent -3.7,-2.88 3.7,2.88, height 7
KBPCxxxxFP [mm]
  rect 3x9.5 hole 7.5 slot 1.1 at 0 deg: 1(0,-1.3)
  rrect25% 9.5x3 hole 1.1 slot 7.5 at 0 deg: 2(2.2,-18) 3(16.7,-18)
  rrect24% 9.5x3 hole 1.1 slot 7.5 at 0 deg: 4(16.7,0)
  silkscreen extent -5.6,-24 24.4,6, body extent -4.88,-23.28 23.72,5.32, height 7.79
LTST-C171K [mm] "LED ;SMD; 0805 2x1.25x0.8"
  rect 1.05x1.4 smd: 1(-0.925,0) 2(0.925,0)
  silkscreen extent -1.95,0.84 -1.86,0.94, body extent -1,-0.63 1,0.63, height 0.8
"M3 MOUNTING HOLE" [mm]
  round 2.5 hole 3.4 unplated mask+0: 2(0,0)
  Keep-Out Layer circle w1.8: c0,0 r2.6
"M3 mounting hole" [mm]
  round 2.5 hole 3.4 unplated mask+0: 2(0,0)
  Keep-Out Layer circle w1.8: c0,0 r2.6
MAR251203FR030S [mm] "Thick film 30mW 3W shunt resistor in 2512 package"
  rect 2.11x3.57 smd: 1(-2.85,0) 2(2.85,0)
  body extent -3.35,-1.75 3.35,1.75, height 1.1
MPP-1UR20/630 [mm] "Capacitor: polypropylene; 1uF; 630VDC; 22x23.7x15.7mm; THT; ±10%"
  round 1.8 hole 0.9: 1(0,0) 2(20,0)
  silkscreen extent -1.52,-8.13 21.59,8.13
R40N3011851012 [mm] "Relay: electromagnetic; Ucoil: 12VDC; SPDT; 40A; max.300VAC; R40N"
  rect 2.3x2.3 hole 1.1: A1(0,0)
  round 2.3 hole 1.1: A2(0,-10.2)
  round 4.3 hole 2.1: COM(-12.86,-13.2) NC(-23.1,3.8) NO(-15.4,3.8)
  silkscreen extent -25.91,-18.8 7.37,9.4
R46KN322000M1K [mm] "Capacitor: polypropylene; X2; R46; 220nF; 560VDC; 275VAC; THT; ±10%"
  round 1.7 hole 0.9: 1(0,0) 2(0,-22.5)
  silkscreen extent -3.3,-24.79 3.3,2.29
RD1C476M05011BB [mm] "Capacitor: electrolytic; THT; 47uF; 16VDC; O5x11mm; Pitch: 2mm; ±20%"
  rect 1.2x1.2 hole 0.6: 1(0,0)
  round 1.2 hole 0.6: 2(2,0)
  silkscreen extent -1.78,-2.8 3.82,2.8
RESISTOR_0805 [mm] "SMD resistor in 0805 package"
  rect 0.95x1.35 smd: 1(-0.925,0) 2(0.925,0)
  silkscreen extent -0.05,-0.58 0.05,0.58, body extent -1.05,-0.67 1.05,0.67, height 0.6
RESISTOR_1206 [mm] "SMD resistor in 1206 package"
  rect 1.1x1.7 smd: 1(-1.4,0) 2(1.4,0)
  silkscreen extent -0.45,-0.75 0.45,0.75, body extent -1.6,-0.85 1.6,0.85, height 0.65
RESISTOR_2512 [mm] "SMD resistor in 2512 package"
  rect 1.35x3.3 smd: 1(-2.925,0) 2(2.925,0)
  body extent -3.25,-1.65 3.25,1.65, height 0.7
SOIC127P590X363-8N [mm] "SOIC, 8-Leads, Body 4,88x3,91mm, Pitch 1,27mm, IPC Medium Density"
  rect 1.35x0.65 smd: 1(-2.775,1.905) 2(-2.775,0.635) 3(-2.775,-0.635) 4(-2.775,-1.905) 5(2.775,-1.905) 6(2.775,-0.635) 7(2.775,0.635) 8(2.775,1.905)
  silkscreen extent -2.9,-2.55 1.7,2.9, body extent -2.97,-2.55 2.97,2.55, height 3.63
SOIC127P1150X275-8N [mm] "SOIC, 8-Leads, Body 5,85x7,50mm, Pitch 1,27mm, IPC Medium Density"
  rect 1.95x0.6 smd: 1(-5.25,1.905) 2(-5.25,0.635) 3(-5.25,-0.635) 4(-5.25,-1.905) 5(5.25,-1.905) 6(5.25,-0.635) 7(5.25,0.635) 8(5.25,1.905)
  silkscreen extent -5.37,-3 3.88,3, body extent -5.75,-3 5.75,3, height 2.75
SOP254P1040X485-8N [mm] "SOP, 8-Leads, Body 9,29x6,62mm, Pitch 2,54mm, IPC Medium Density"
  rect 2.25x0.65 smd: 1(-4.575,3.81) 2(-4.575,1.27) 3(-4.575,-1.27) 4(-4.575,-3.81) 5(4.575,-3.81) 6(4.575,-1.27) 7(4.575,1.27) 8(4.575,3.81)
  silkscreen extent -4.7,-4.8 3.05,4.81, body extent -5.2,-4.8 5.2,4.8, height 4.85
SOT90P240X110-3N [mm] "SOT23, 3-Leads, Body 2,90x2,40mm, Pitch 0,90mm, IPC Medium Density"
  rect 0.95x0.65 smd: 1(-1.175,0.9) 2(-1.175,-0.9) 3(1.175,0)
  silkscreen extent -1.3,-1.5 0.7,1.9, body extent -1.25,-1.5 1.25,1.5, height 1.1
STTH1R06A [mm] "Diode: rectifying; SMD; 600V; 1A; 25ns; SMA; Ufmax: 1V; Ifsm: 20A"
  rect 2.4x1.55 smd: 1(-1.95,0) 2(1.95,0)
  silkscreen extent -3.47,-1.45 2.7,1.45, body extent -2.9,-1.45 2.9,1.45, height 2.45
"TBA 1-1211E" [mm] "Converter: DC/DC; 1W; Uin: 10.8÷13.2VDC; Uout: 5VDC; Iout: 200mA"
  round 1 hole 0.6: 1(12.7,0) 2(10.16,0) 4(5.08,0) 6(0,0)
  body extent -4.42,-1.4 15.08,4.6, height 10
TestPoint_1.5mm [mm] "1.5mm smd round testpoint"
  round 1.5 smd: 1(0,0)
TO220-3 [mm] "TO220-3-Leads, Body 10.03 X 4.435mm,Pitch 2.54mm"
  rect 1.6x1.6 hole 1 paste-2539.97 mask+0: 1(0,2.54)
  round 1.6 hole 1 paste-2539.97 mask+0: 2(0,0) 3(0,-2.54)
  silkscreen extent -1.85,-5.01 2.59,5.97, body extent -2.04,-5.25 2.82,5.25, height 19.6
UCC21520ADW [mm] "IC: driver; MOSFET half-bridge; high-/low-side,gate driver; SO16"
  rrect25% 2.06x0.6 smd paste+0 mask+0.102: 1(-4.64,4.445) 2(-4.64,3.175) 3(-4.64,1.905) 4(-4.64,0.635) 5(-4.64,-0.635) 6(-4.64,-1.905) 7(-4.64,-3.175) 8(-4.64,-4.445) 9(4.64,-4.445) 10(4.64,-3.175) 11(4.64,-1.905) 12(4.64,-0.635) 13(4.64,0.635) 14(4.64,1.905) 15(4.64,3.175) 16(4.64,4.445)
  silkscreen extent -6.4,-5.15 3.75,5.15, body extent -5.15,-5.15 5.15,5.15, height 2.65

## Part data
C1 C14 C27: library part CAPACITOR_1206, "MLCC capacitor in 1206 package"
C2 C3 C4 C5 C6 C7 C8 C9 C10 C11 C15 C16 C17 C18 C19 C20 C21 C22 C23 C24 C28 C29 C30 C31 C32 C33 C34 C35 C36 C37 C48 C49 C50 C51 C52 C53 C54: library part CAPACITOR_0805, "MLCC capacitor in 0805 package"
C40: library part R46KN322000M1K, "Capacitor: polypropylene; X2; R46; 220nF; 560VDC; 275VAC; THT; ±10%"
C41 C42 C43 C44: library part HF2G477M35040HC, "Capacitor: electrolytic; SNAP-IN; 470uF; 400VDC; Ø35x40mm; ±20%"
C45: library part MPP-1UR20/630, "Capacitor: polypropylene; 1uF; 630VDC; 22x23.7x15.7mm; THT; ±10%"
C46: library part EEUFR1V221, "Capacitor: electrolytic; low ESR; THT; 220uF; 35VDC; Ø8x11.5mm"
C47: library part RD1C476M05011BB, "Capacitor: electrolytic; THT; 47uF; 16VDC; Ø5x11mm; Pitch: 2mm; ±20%"
D1 D4 D7: "Diode: rectifying; SMD; 600V; 1A; 25ns; SMA; Ufmax: 1V; Ifsm: 20A"
D2 D3 D5 D6 D8 D9 D11: "1A, 40V, Schottky Rectifier", Package="SMA-2 Taiwan Semiconductor", Check_prices=https://www.snapeda.com/parts/SS14/taiwan/view-part/?ref=eda, MF="Taiwan Semiconductor", MP=SS14, SnapEDA_Link=https://www.snapeda.com/parts/SS14/taiwan/view-part/?ref=snap
D12 D13 D14: "LED; red; SMD; 0805; 18÷54mcd; 2÷2.4VDC; 2x1.25x0.8mm; 130°; 20mA"
F1: library part 0751.0056, "Fuse clips; cylindrical fuses; THT; 5x20mm,6.3x32mm; 16A; bronze"
J1 J3 J4: library part 1729018, "Connector: PCB terminal block; 17.5A; 400V; PIN: 2; screw terminal"
J2: "Connector: wire-board; XH; socket; male; data; 3A; 250V; PIN: 2; 2.5mm"
J5: "Connector: IDC; socket; male; PIN: 10; straight; THT; 2.54mm; 2x5"
J6: library part 1729131, "Connector: PCB terminal block; 17.5A; 400V; PIN: 3; screw terminal"
J7: "Connector: IDC; socket; male; data; PIN: 14; straight; THT; 2.54mm"
MH1 MH2 MH3 MH4 MH5 MH6 MH7 MH8: library part M3_mounting_hole
PS1 PS2 PS3: "Converter: DC/DC; 1W; Uin: 10.8÷13.2VDC; Uout: 5VDC; Iout: 200mA"
PS4: "Power Supply,AC-DC,12V,0.85A,100-264V In,Encapsulated,Thru-Hole,IRM Series", Package=None, Check_prices=https://www.snapeda.com/parts/IRM-10-12/Mean+Well/view-part/?ref=eda, MF="MEAN WELL", MP=IRM-10-12, SnapEDA_Link=https://www.snapeda.com/parts/IRM-10-12/Mean+Well/view-part/?ref=snap
PS5: "Enclosed AC DC Converters 1 Output 5V - - - 2A 85 ~ 305 VAC, 120 ~ 430 VDC Input", Package=None, Availability="In Stock", Check_prices=https://www.snapeda.com/parts/IRM-10-5/Mean+Well/view-part/?ref=eda, MF="MEAN WELL", MP=IRM-10-5, Price=None, Purchase-URL=https://pricing.snapeda.com/search/part/IRM-10-5/?ref=eda, SnapEDA_Link=https://www.snapeda.com/parts/IRM-10-5/Mean+Well/view-part/?ref=snap
Q1 Q2 Q3 Q4 Q5 Q6 Q9: "Transistor: N-MOSFET; WMOS™ C4; unipolar; 650V; 20A; Idm: 100A; 277W", Manufacturer=WAYON, ManufacturerPartNumber=WMK36N65C4, PackageReference=PG-TO220
Q7 Q10: "Transistor: P-MOSFET; unipolar; -40V; -8A; 1.1W; SO8"
Q8 Q11: "Transistor: N-MOSFET; unipolar; 20V; 2.3A; 0.5W; SOT23"
R1 R20 R39 R76 R77 R78 R79 R82 R84 R86: library part RESISTOR_1206, "SMD resistor in 1206 package"
R2 R3 R4 R5 R7 R8 R11 R12 R13 R14 R15 R16 R17 R18 R19 R21 R22 R23 R24 R26 R27 R30 R31 R32 R33 R34 R35 R36 R37 R38 R40 R41 R42 R43 R45 R46 R49 R50 R51 R52 R53 R54 R55 R56 R57 R61 R62 R63 R64 R65 R66 R67 R68 R69 R70 R71 R72 R73 R74 R75 R80 R81 R83 R85: library part RESISTOR_0805, "SMD resistor in 0805 package"
R6 R9 R10 R25 R28 R29 R44 R47 R48: library part MAR251203FR030S, "Resistor: thick film; 30mΩ; sensing; SMD; 2512; 3W; ±1%; -55÷170°C", Manufacturer=Wayon, Power=3W, Tolerance=1%, ComponentLink1Description=TME, ComponentLink1URL=https://www.tme.eu/pl/details/mar251203fr010s/rezystory-smd/wayon/
R58: library part CRL30W-220R, "30W 220Ω cement resistor", Manufacturer="SR PASSIVES", Power=30W, Tolerance=5%
R59 R60: library part RESISTOR_2512, "SMD resistor in 2512 package"
RELAY1: "Relay: electromagnetic; Ucoil: 12VDC; SPDT; 40A; max.300VAC; R40N", Manufacturer=RELPOL
RV1: "Varistor: metal-oxide; THT; 275VAC; 350VDC; 430V; 8000A; Ø22.5mm"
U1 U3 U5: "5.7kVrms, 4A/6A dual-channel isolated gate driver w/ dual input, disable pin, 8V UVLO in DW package", Package="SOIC-16 Texas Instruments", Check_prices=https://www.snapeda.com/parts/UCC21520ADW/Texas+Instruments/view-part/?ref=eda, MF="Texas Instruments", MP=UCC21520ADW, SnapEDA_Link=https://www.snapeda.com/parts/UCC21520ADW/Texas+Instruments/view-part/?ref=snap
U2 U4 U6: library part AMC1200, "AMC1200/B Fully-Differential Isolation Amplifier", Manufacturer="Texas Instruments"
U7: library part AP7387, "WIDE INPUT VOLTAGE RANGE, 150mA ULDO REGULATOR", Manufacturer="Diodes Incorporated", Iout=150mA, Vout=5V
U8 U10: "8-pin SOIC Single-Channel Phototransistor Output Optocoupler", Isolation voltage=2,5kV, Manufacturer=ONSEMI/Fairchild, CTR=100-200%, toff=4,7us, ton=3,2us, Vce=30V
U9: library part AMC1211, "AMC1211-Q1 Automotive, High-Impedance, 2-V Input, Basic Isolated Amplifier", Manufacturer="Texas Instruments"
D10: Datasheet=https://diotec.com/de/produktliste/B1.html, ki_description=Bridge_1_phase, ki_keywords="Bridge 1 phase"

## Via types
v1: diameter 0.8, hole 0.4, Top Layer to Bottom Layer, tented both sides, 82 vias
v2: diameter 0.6, hole 0.3, Top Layer to Bottom Layer, tented both sides, 68 vias
v3: diameter 1, hole 0.5, Top Layer to Bottom Layer, tented both sides, 3 vias

## Nets (pads, with @x,y where several pads share a name; then routed paths per layer and width w, separated by ;. In a path a pad name is that pad's centre, name@x,y a point inside that pad or via, vN(x,y) a via of type N, cw(c..) or ccw(c..) an arc to the next point about the centre after c; other vN are vias at no path point)
5V_HOT_2: C9.2 PS1.6 R81.1 R82.1 U2.1 | length 18.6
  Top Layer w0.5: R81.1@67.5,110.075 67.725,110.3 68.2,110.3 69.4,111.5 69.4,111.8 69.7,112.1 72.6,112.1 73,112.5 PS1.6@76.42,112.5 76.42,110.58 77.31,109.69 U2.1@77.31,107.925 ; v1(76,108) 77.235,108 U2.1@77.31,107.925 ; U2.1@77.31,107.575 U2.1@77.31,107.925
  Bottom Layer w0.5: C9.2@74.325,108.5 75.5,108.5 v1(76,108)
5V_HOT_3: C22.2 PS2.6 R83.1 R84.1 U4.1 | length 18.2
  Top Layer w0.5: R83.1@154,110.65 154.225,110.875 154.875,110.875 155.32,111.32 156.22,111.32 R84.1@156.5,111.6 159.1,111.6 160,112.5 PS2.6@162.84,112.5 163.81,111.53 U4.1@163.81,107.925 ; v1(162.5,108) 163.735,108 U4.1@163.81,107.925 ; U4.1@163.81,107.575 U4.1@163.81,107.925
  Bottom Layer w0.5: C22.2@160.825,108.5 162,108.5 v1(162.5,108)
5V_HOT_4: C35.2 PS3.6 R85.1 R86.1 U6.1 | length 19
  Top Layer w0.5: R85.1@110,110.575 111.425,110.575 111.9,111.05 111.9,111.3 R86.1@112.2,111.6 ; R86.1@112.5,111.6 R86.1@112.8,111.6 ; R86.1@113.1,111.9 R86.1@112.8,111.6 ; v1(118.5,108) 119.735,108 U6.1@119.81,107.925 ; U6.1@119.81,107.65 U6.1@119.81,107.925 ; U6.1@119.81,108.45 U6.1@119.81,107.925 ; R86.1@112.8,111.6 114.6,111.6 115.5,112.5 PS3.6@118.92,112.5 118.92,110.58 119.81,109.69 U6.1@119.81,107.925
  Bottom Layer w0.5: C35.2@116.825,108.5 118,108.5 v1(118.5,108)
+3V3A: C8.2 C21.2 C34.2 C50.2 C51.2 J5.9 U2.8 U4.8 U6.8 U9.8 | length 229.9
  Top Layer w0.5: C50.2@63.6,91.125 63.225,91.5 C51.2@63.225,93.8 63.218,93.807 63.218,94.982 62.355,95.845 62.355,97.2 U9.8@62.405,97.25 63.75,97.25 v2(64.5,98) v2(66,98) ; C8.2@76.325,94 76.325,94.1 76.7,94.475 76.8,94.475 77.31,94.985 U2.8@77.31,98.425 79.075,98.425 v2(79.5,98) v2(81,98) ; C34.2@118.825,94.1 119.2,94.475 119.276,94.475 119.81,95.009 U6.8@119.81,98.5 121.5,98.5 v2(122,98) v2(123.5,98) ; C21.2@162.825,94 162.825,94.1 163.2,94.475 163.3,94.475 163.81,94.985 U4.8@163.81,98.425 ; U4.8@163.885,99.3 163.81,99.225 U4.8@163.81,98.425 ; v2(167.5,98) v2(166,98) 165.575,98.425 U4.8@163.81,98.425
  Bottom Layer w1: v2(64.5,98) v2(66,98) v2(79.5,98) v2(81,98) v2(122,98) v2(123.5,98) v2(166,98) v2(167.5,98) 195.5,98 211,113.5 216,113.5 219,110.5 219,88.36 J5.9@213.46,82.82
+5V: C2.1 C15.1 C28.1 C47.2 J2.1 PS5.4 R4.2 R23.2 R42.2 R61.2 R69.2 TP20.1 U1.3 U1.8 U3.3 U3.8 U5.3 U5.8 | length 413.8
  Top Layer w0.3: TP20.1@198.5,60.5 200,62 200.5,62
  Top Layer w0.5: U1.3@97.095,98.36 97.095,99.09 98.005,100 102.535,100 U1.8@103.445,99.09 ; C2.1@104.325,94.5 C2.1@104.325,94.451 ; R4.2@106.5,93.85 106.3,93.85 106.075,94.075 106.075,94.107 105.782,94.4 104.325,94.4 C2.1@104.325,94.451 ; v2(107,99.5) v2(105.5,99.5) 105,99 103.495,99 103.445,98.95 103.445,96.555 104.262,95.738 104.262,94.388 C2.1@104.325,94.451 ; U5.3@139.595,98.36 139.595,99.09 140.345,99.84 145.195,99.84 145.945,99.09 U5.8@145.945,99.015 ; R42.2@149,93.85 148.8,93.85 148.575,94.075 148.575,94.207 148.282,94.5 C28.1@146.825,94.5 146.818,94.507 146.818,95.682 145.995,96.505 145.995,98.31 U5.8@145.945,98.36 U5.8@145.945,99.015 ; v2(149.5,99.5) v2(148,99.5) 147.565,99.065 145.995,99.065 U5.8@145.945,99.015 ; U3.3@183.595,98.36 183.645,98.41 183.645,99.312 184.173,99.84 189.367,99.84 189.895,99.312 189.895,98.41 U3.8@189.945,98.36 ; R23.2@193,93.925 192.8,93.925 192.575,94.15 192.575,94.207 192.282,94.5 C15.1@190.825,94.5 190.818,94.507 190.818,95.682 189.945,96.555 U3.8@189.945,98.36 ; v2(193.5,99.5) v2(192,99.5) 191.565,99.065 189.995,99.065 189.945,99.015 U3.8@189.945,98.36
  Top Layer w1: R61.2@59.85,75 v1(62,75) ; R69.2@89.425,66 v1(91.5,66) v1(93,66) v1(94.5,66) 196.5,66 200.5,62 202,60.5 C47.2@205,60.5 ; PS5.4@215.75,42.75 205,53.5 C47.2@205,60.5 ; J2.1@215.975,60.75 215.725,60.5 C47.2@205,60.5
  Bottom Layer w1: v1(94.5,66) v1(93,66) v1(91.5,66) 81.5,66 72.5,75 v1(62,75) 61,75 56,80 56,97.5 58,99.5 v2(105.5,99.5) v2(107,99.5) v2(148,99.5) v2(149.5,99.5) v2(192,99.5) v2(193.5,99.5)
+5V_HOT_6: C49.2 C52.2 U7.2 U9.1 | length 14.3
  Top Layer w0.5: U7.2@53.675,114.225 53.712,114.187 55.963,114.187 C49.2@56,114.15 C52.2@58.5,114.15 58.65,114 61,114 62.405,112.595 U9.1@62.405,107.75